# Altium PCB Flight_Computer_2_GE.PcbDoc (part 4 of 5)
Units mil, origin at the board's own origin, x right, y up, seen from the top; angles counter-clockwise.
Board outline 4000 x 3000 mil, 4 copper layers (Top Layer, GND, 3.3V, Bottom Layer), stack 62.449 mil thick; 220 components, 150 nets, 776 pads, 444 vias.
Unrouted connection lines stored in the file: 107.
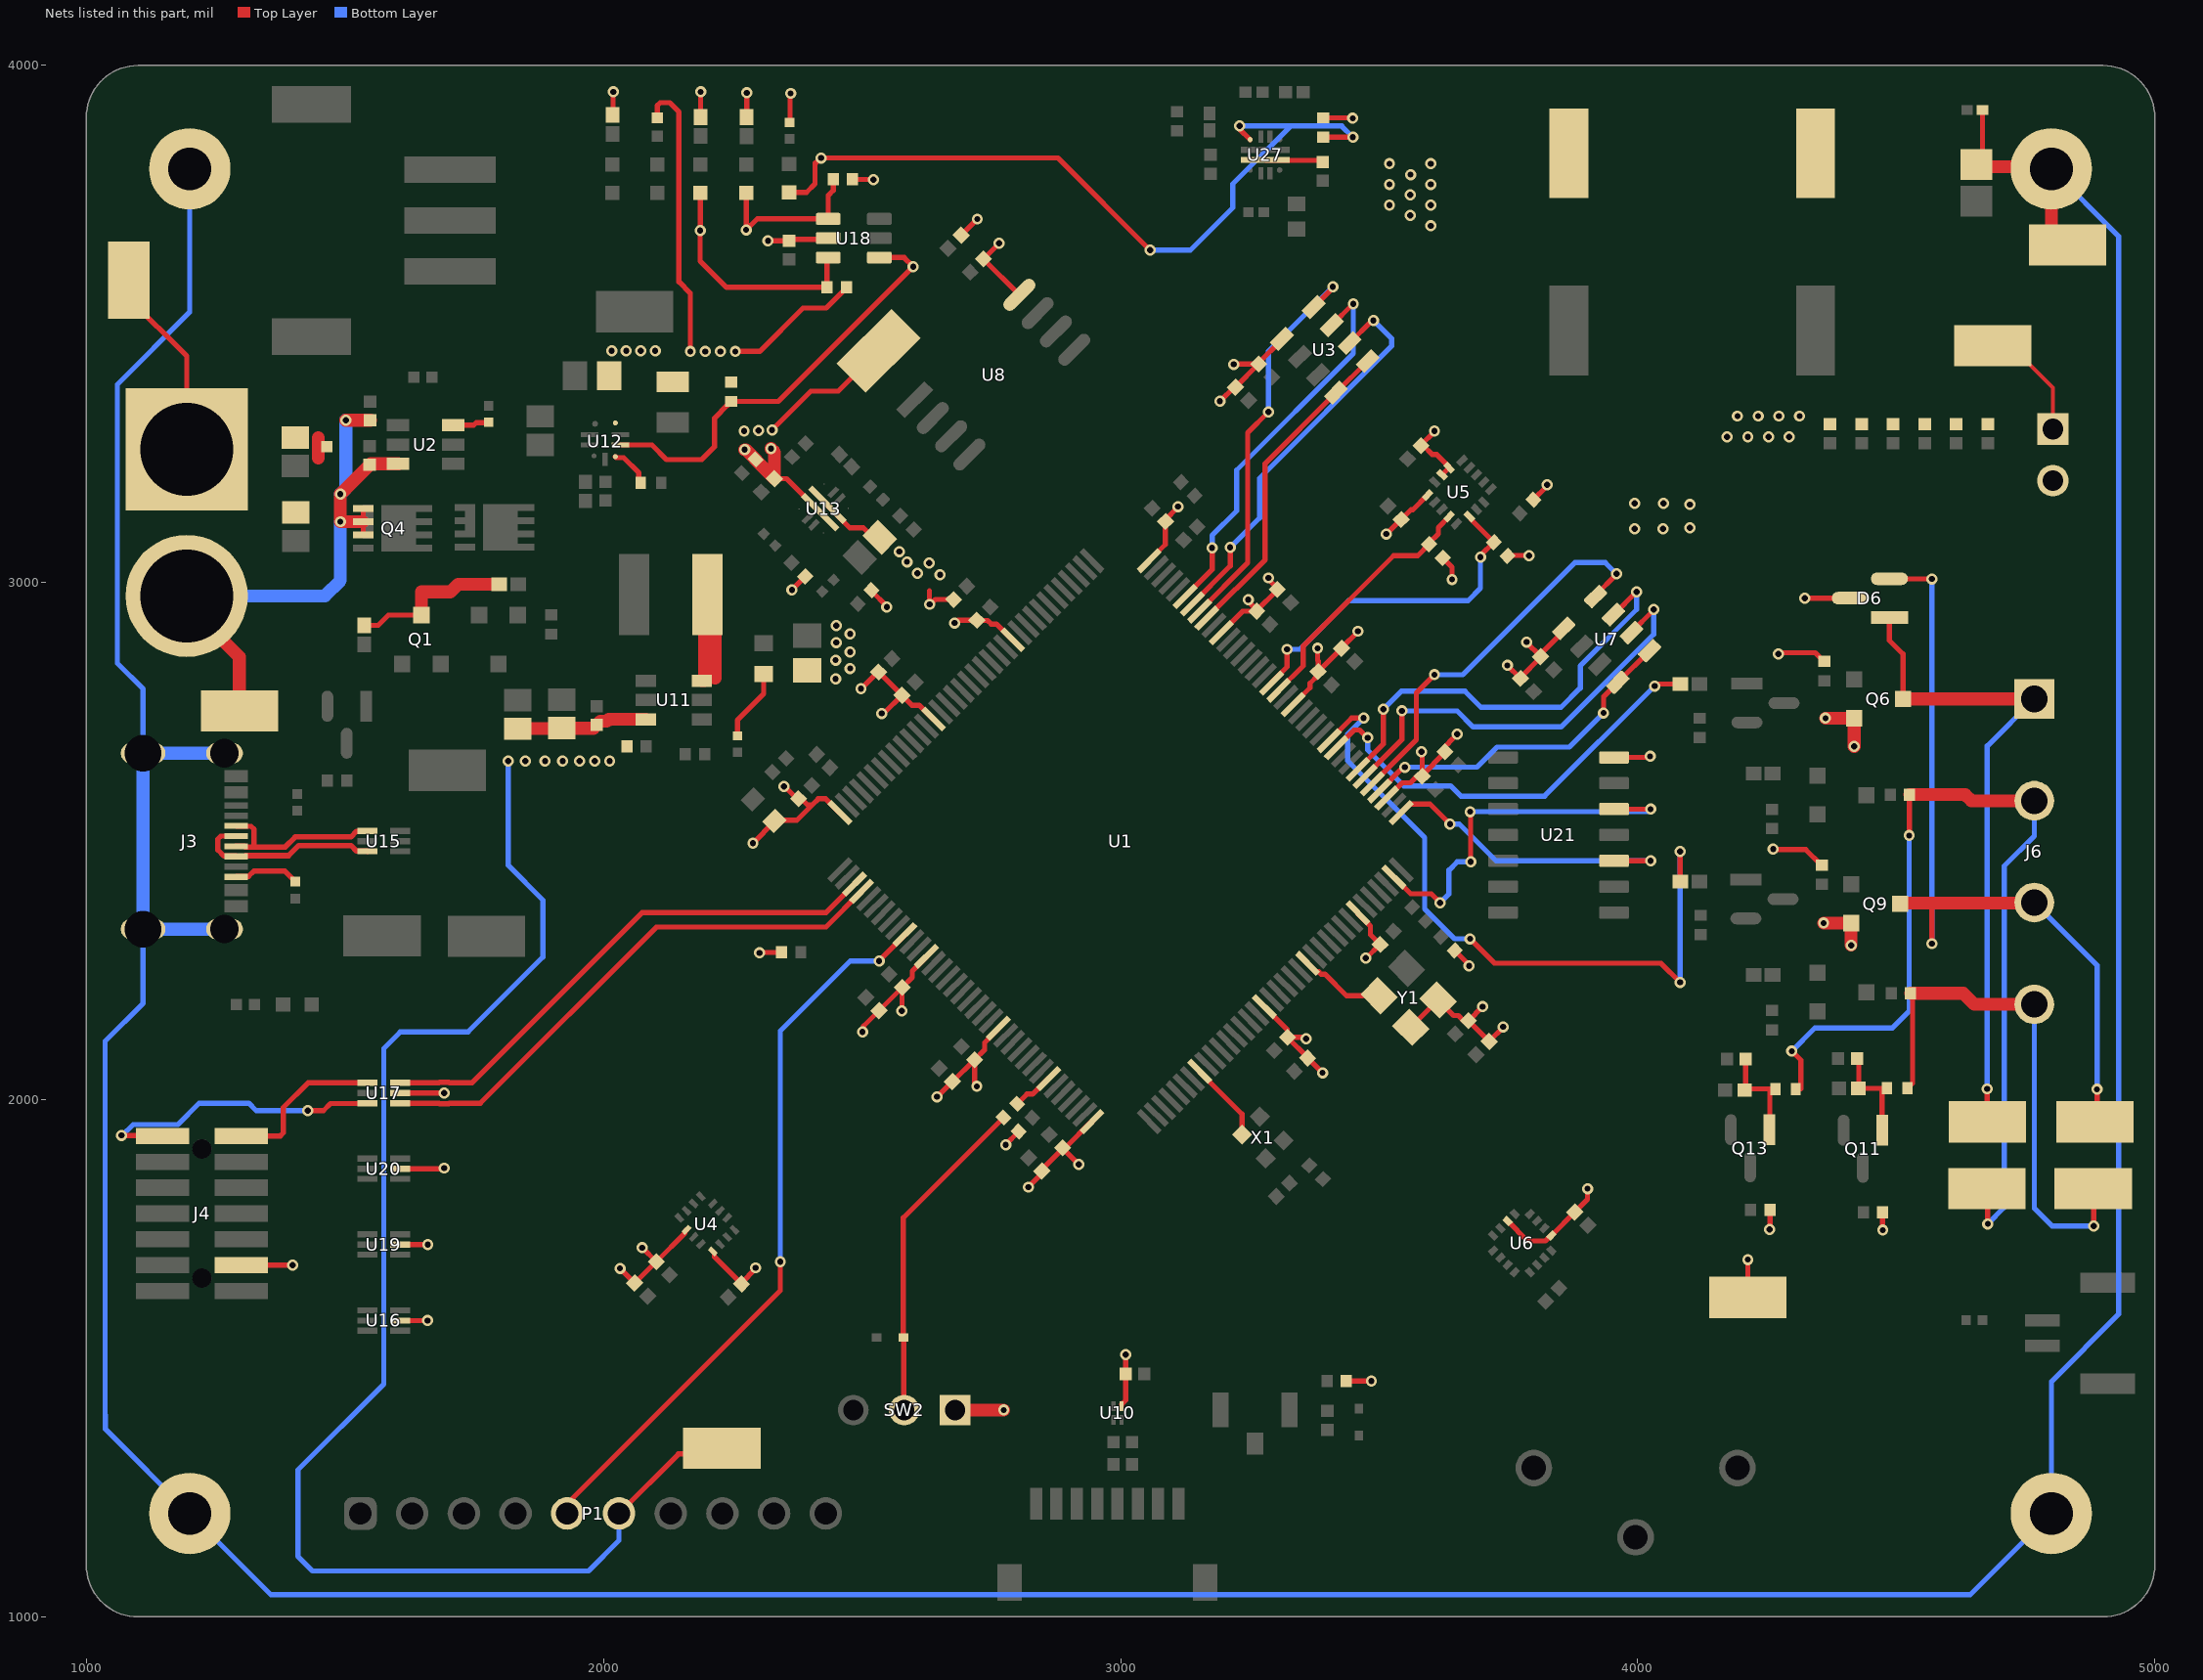
[diagram p4: the nets of this part, all layers, seen from the top]

## Part data (continued)
U2: "The Chip Type:Protection IC Voltage - Supply:1.5V~10V Voltage - Supply:1.5V~10V Charge Current - Max:- Charging Saturation Voltage:4.28V End-Off Voltage:2.9V Type of Battery:Lithium Battery Number of Cells:2 Number of Cells:2 Operating Temperature:-40℃~+8", Balance Current=-, Battery Temperature Detection="Not supported", Charging Saturation Voltage=4.28V, End-Off Voltage=2.9V, JLCPCB Part Class="Extended Part", LCSC Part Name=2节锂离子/锂聚合物电池组保护IC, Manufacturer=HYCON(宏康), Operating Temperature=-40℃~+85℃, Supply Current (Iq)=100nA, Voltage - Supply=1.5V~10V, 0V Battery Charge=Support, AddInBom=yes, Charge Current - Max=-, ConvertToPcb=yes, Datasheet=https://item.szlcsc.com/datasheet/HY2120-CB/117763.html, Device=HY2120-CB, Features="Overcharge protection；Overcurrent Protection；Over-discharge protection；Short-Circuit  Protection", FootprintName=SOT-23-6_L2.9-W1.6-P0.95-LS2.8-BR, Interface=-, ManufacturerPart=HY2120-CB, ModelId=1370be37a17e44418ae52e2b4cc1f5e5ÂŽ0819f05c4eef4c71ace90d822a990e87, ModelName=SOT-23-6_L2.9-W1.6-H1.5-LS2.8-P0.95, ModelTransform=110.73671,114.173,0,180,0,0,0.001,-0.003,0, Number of Cells=2, Supplier=LCSC, Supplier Footprint=SOT-23-6, SupplierPart=C116509, Symbol=HY2120CB, The Chip Type="Protection IC", Type of Battery="Lithium Battery"
U3: "SENSOR 17.4PSIA 24BIT 8SMD", LCSC Part #=C97627, Manufacturer="TE Connectivity", Max Operating Temperature=85°C, Max Supply Voltage=3.6V, Min Operating Temperature=-40°C, Min Supply Voltage=1.8V, Operating Current-Max=1.4mA, Package Shape/Style=Rectangular, Supplier Part Number=223-1198-1-ND, Accuracy-Max (%)=4%, Body Breadth=3mm, Body Height=0.95mm, Body Length or Diameter=5mm, Category="Pressure Sensors", ComponentLink1Description=https://www.te.com:443/usa-en/product-MS560702BA03-50.datasheet.pdf?src-supplier=IHS+Markit, ComponentLink1URL=https://www.te.com:443/usa-en/product-MS560702BA03-50.datasheet.pdf?src-supplier=IHS+Markit, ComponentLink2Description=http://www.farnell.com/datasheets/1756127.pdf?src-supplier=Farnell, ComponentLink2URL=http://www.farnell.com/datasheets/1756127.pdf?src-supplier=Farnell, ComponentLink3Description=https://datasheet.octopart.com/MS560702BA03-50-TE-Connectivity-datasheet-21074431.pdf?src-supplier=Element14, ComponentLink3URL=https://datasheet.octopart.com/MS560702BA03-50-TE-Connectivity-datasheet-21074431.pdf?src-supplier=Element14, ComponentLink4Description=https://www.te.com/commerce/DocumentDelivery/DDEController?Action=srchrtrv&DocNm=MS5607-02BA03&DocType=Data+Sheet&DocLang=English&src-supplier=Digikey, ComponentLink4URL=https://www.te.com/commerce/DocumentDelivery/DDEController?Action=srchrtrv&DocNm=MS5607-02BA03&DocType=Data+Sheet&DocLang=English&src-supplier=Digikey, ComponentLink5Description=https://datasheet.octopart.com/MS560702BA03-50-TE-Connectivity-datasheet-176112741.pdf?src-supplier=Future+Electronics, ComponentLink5URL=https://datasheet.octopart.com/MS560702BA03-50-TE-Connectivity-datasheet-176112741.pdf?src-supplier=Future+Electronics, ComponentLink6Description=https://datasheet.octopart.com/MS560702BA03-50-TE-Connectivity-datasheet-65793091.pdf?src-supplier=Sager+Electronics, ComponentLink6URL=https://datasheet.octopart.com/MS560702BA03-50-TE-Connectivity-datasheet-65793091.pdf?src-supplier=Sager+Electronics, Manufacturer Part Number=MS560702BA03-50, Mounting Technology="Surface Mount", Number of Bits=24, Output Interface Type=I2C, Output Range=0-3V, Output Type="DIGITAL VOLTAGE", Pressure Range-Max=15.95PSI, Pressure Range-Min=4.351PSI, Pressure Type=Barometric, Pricing="1=9.05, 5=8.384, 10=7.721, 25=7.436, 50=6.9272, 100=5.8731, 500=5.46908, 1000=5.89422, 3600=5.375 (USD)", Reach SVHC Compliant=No, Response Time=8220us, RoHS=Yes, RoHS Compliant=Yes, Sensor Type="PRESSURE SENSOR,PEIZORESISTIVE", Stock=43971, Supplier=Digikey, Termination=Solder
U4: "Accelerometer and Gyroscope 6-Axis 3D Digital-I2C/Digital-SPI-OUT 14-Pin LGA T/R", LCSC Part #=C459826, Manufacturer=STMicroelectronics, Max Operating Temperature=105°C, Max Supply Voltage=3.6V, Min Operating Temperature=-40°C, Min Supply Voltage=2V, Mouser Part Number=511-ASM330LHHTR, Operating Supply Voltage=3V, Supplier Part Number=497-19078-1-ND, Arrow Part Number=ASM330LHHTR, Arrow Price/Stock=https://www.arrow.com/en/products/asm330lhhtr/stmicroelectronics?utm_currency=USD&region=europe, Category=Accelerometers, China RoHS=Non-Compliant, ComponentLink1Description=https://datasheet.octopart.com:443/ASM330LHHTR-STMicroelectronics-datasheet-181242432.pdf?src-supplier=IHS, ComponentLink1URL=https://datasheet.octopart.com:443/ASM330LHHTR-STMicroelectronics-datasheet-181242432.pdf?src-supplier=IHS, ComponentLink2Description=https://datasheet.octopart.com:443/ASM330LHHTR-STMicroelectronics-datasheet-129375621.pdf?src-supplier=ODG+(Origin+Data+Global), ComponentLink2URL=https://datasheet.octopart.com:443/ASM330LHHTR-STMicroelectronics-datasheet-129375621.pdf?src-supplier=ODG+(Origin+Data+Global), Datasheet Link=https://www.st.com/resource/en/datasheet/asm330lhh.pdf, Height=0.86mm, Height - Seated (Max)=860µm, Length=3mm, Lifecycle Status=Production, Manufacturer Part Number=ASM330LHHTR, Manufacturer_Name=STMicroelectronics, Manufacturer_Part_Number=ASM330LHHTR, Mouser Price/Stock=https://www.mouser.co.uk/ProductDetail/STMicroelectronics/ASM330LHHTR?qs=lc2O%252BfHJPVYgP8P9MzExKQ%3D%3D, Number of Circuits=1, Number of Terminals=14, Output Type=Digital, Pricing="1=7.25, 5=6.54, 10=6.275, 25=5.9592, 50=5.743, 100=5.545, 500=5.34888 (USD)", REACH SVHC=Yes, RoHS=Compliant, Stock=5000, Supplier=DigiKey, Terminal Pitch=500µm, Width=2.5mm
U5: "ACCELEROMETER 100G I2C/SPI 16LGA", Case/Package=LGA, LCSC Part #=C2655068, Manufacturer=STMicroelectronics, Max Operating Temperature=85°C, Max Supply Voltage=3.6V, Min Operating Temperature=-40°C, Min Supply Voltage=2.16V, Mouser Part Number=511-H3LIS100DLTR, Operating Supply Voltage=2.5V, Supplier Part Number=497-15697-1-ND, Arrow Part Number=H3LIS100DLTR, Arrow Price/Stock=https://www.arrow.com/en/products/h3lis100dltr/stmicroelectronics?region=nac, Axis="X, Y, Z", Bandwidth=200Hz, Category=Accelerometers, China RoHS=Non-Compliant, ComponentLink1Description=https://datasheet.octopart.com:443/H3LIS100DLTR-STMicroelectronics-datasheet-181243375.pdf?src-supplier=IHS, ComponentLink1URL=https://datasheet.octopart.com:443/H3LIS100DLTR-STMicroelectronics-datasheet-181243375.pdf?src-supplier=IHS, ComponentLink2Description=https://datasheet.octopart.com:443/H3LIS100DLTR-STMicroelectronics-datasheet-41189296.pdf?src-supplier=element14+APAC, ComponentLink2URL=https://datasheet.octopart.com:443/H3LIS100DLTR-STMicroelectronics-datasheet-41189296.pdf?src-supplier=element14+APAC, Datasheet Link=https://www.st.com/resource/en/datasheet/h3lis100dl.pdf, Height=1mm, Height - Seated (Max)=1mm, Lead Free="Lead Free", Length=3mm, Lifecycle Status=Production, Manufacturer Part Number=H3LIS100DLTR, Manufacturer_Name=STMicroelectronics, Manufacturer_Part_Number=H3LIS100DLTR, Mounting Technology="Surface Mount", Mouser Price/Stock=https://www.mouser.co.uk/ProductDetail/STMicroelectronics/H3LIS100DLTR?qs=v3MacVxtdDLHj8sdza6BGw%3D%3D, Number of Circuits=1, Number of Terminals=16, Output Type=Digital, Pins=16, Pricing="1=6.69, 5=6.03, 10=5.783, 25=5.4888, 50=5.2876, 100=5.1032, 500=4.88678 (USD)", REACH SVHC=No, RoHS=Compliant, Schedule B="8542390000, 8542390000|8542390000|8542390000|8542390000|8542390000|8542390000|8542390000|8542390000|8542390000|8542390000|8542390000|8542390000|8542390000|8542390000|8542390000|8542390000|8542390000|8542390000|8542390000|8542390000|8542390000|8542390000|8542390000|85", Stock=8694, Supplier=DigiKey, Terminal Pitch=500µm, Width=3mm
U6: "8 Gauss, High Performance 3-axis Magnetic Sensor Automotive AEC-Q100", LCSC Part #=C404329, Manufacturer=Memsic, Manufacturer_Name=MEMSIC, Max Operating Temperature=105°C, Max Supply Voltage=3.6V, Min Operating Temperature=-40°C, Min Supply Voltage=2.8V, Mouser Part Number=438-MMC5983MA, Supplier Part Number=1267-MMC5983MACT-ND, Arrow Part Number=MMC5983MA, Arrow Price/Stock=https://www.arrow.com/en/products/mmc5983ma/memsic?utm_currency=USD&region=nac, Category="Linear ICs", ComponentLink1Description=https://datasheet.octopart.com:443/MMC5983MA-Memsic-datasheet-180628270.pdf?src-supplier=IHS, ComponentLink1URL=https://datasheet.octopart.com:443/MMC5983MA-Memsic-datasheet-180628270.pdf?src-supplier=IHS, ComponentLink2Description=https://datasheet.octopart.com:443/MMC5983MA-Memsic-datasheet-160655074.pdf?src-supplier=Upverter, ComponentLink2URL=https://datasheet.octopart.com:443/MMC5983MA-Memsic-datasheet-160655074.pdf?src-supplier=Upverter, Datasheet Link=https://www.mouser.com/datasheet/2/821/Memsic_09102019_MMC5983MA_Datasheet_Rev_A-1635338.pdf, Height=1mm, Length=3mm, Manufacturer Part Number=MMC5983MA, Manufacturer_Part_Number=MMC5983MA, Mounting Technology="Surface Mount", Mouser Price/Stock=https://www.mouser.co.uk/ProductDetail/MEMSIC/MMC5983MA?qs=B6kkDfuK7%2FD5qasHMdEt2g%3D%3D, Number of Terminals=16, Pricing="1=2.79, 5=2.49, 10=2.378, 25=2.244, 50=2.1522, 100=2.0681, 500=1.899, 1000=1.83604 (USD)", REACH SVHC=Yes, RoHS=Compliant, Sensing Method=Magnetoresistive, Stock=65243, Supplier=DigiKey
U7: library part CMP-010-00021-3, "Barometric Pressure Sensor, 1.8 to 3.6 V, -40 to 85 degC, 8-Pin SMD, RoHS, Tape and Reel", Case/Package=LGA-8, Max Operating Temperature=85°C, Max Supply Voltage=3.6V, Min Operating Temperature=-40°C, Min Supply Voltage=1.8V, Mounting Technology=SMT, Pins=8, RoHS Compliant=Yes, Sensor Type=Barometer
U8: library part CMP-06315-000040-1, "IC FLASH 64MBIT SPI/QUAD 8SOIJ", Case/Package=SOIC, Frequency=104MHz, Max Operating Temperature=85°C, Min Operating Temperature=-40°C, Memory Size=64Mb, Memory Type=Non-Volatile, Mount="Surface Mount", Packaging=Rail/Tube, RoHS Compliant=Yes, Series="SST26 SQI®"
U10: library part CMP-009-00205-1, "5V, 3A, 25M LOAD SWITCH WITH OPT", Pins=4
U11: library part CMP-049-000000-1, "4.5 V to 17 V input, 4 A output, synchronous step-down converter in Eco-mode 6-SOT-23-THIN -40 to 125", Manufacturer_Name="Texas Instruments", Copyright="Copyright (C) 2025 Ultra Librarian. All rights reserved.", Design Item ID=TPS564201DDCR, Manufacturer_Part_Number=TPS564201DDCR, RefDes=RefDes, Source=TPS564201DDCR.SchLib, Type=TYPE
U12: "IC REG BUCK ADJ 3A 9VQFN", LCSC Part #=C5342042, Manufacturer="Texas Instruments", Supplier Part Number=296-TPS62993QRYTRQ1CT-ND, Category="Integrated Circuits (ICs)", Manufacturer Part Number=TPS62993QRYTRQ1, Pricing="1=1.93, 10=1.418, 25=1.2916, 100=1.1519, 250=1.0854, 500=1.0453, 1000=1.01229 (USD)", RoHS=No, Stock=5849, Supplier=Digikey
U13: "FET Type:Integrated FET Number of Lines:1 Trigger Current:500mA~4.44A Trigger Current:500mA~4.44A Voltage Rating:2.7V~5.7V Voltage Rating:2.7V~5.7V Mounting Type:Surface Mount RDS(on):31mΩ Operating temperature:-40℃~+125℃ Operating temperature:-40℃~+125℃", JLCPCB Part Class="Extended Part", LCSC Part Name=具有输入反极性保护功能的电子保险丝, Manufacturer=TI(德州仪器), Operating Temperature=-40℃~+125℃, Trigger Current=500mA~4.44A, Voltage Rating=2.7V~5.7V, AddInBom=yes, ConvertToPcb=yes, Datasheet=https://www.ti.com/cn/lit/ds/symlink/tps2521.pdf, Device=TPS25210ARPWR, Features="Thermal Protection；Overcurrent Protection；Overvoltage clamping protection；Under-voltage lockout；Short-Circuit  Protection", FET Type="Integrated FET", FootprintName=VQFN-10_L2.0-W2.0-P0.45-TL, Height=1mm, Length=2mm, ManufacturerPart=TPS25210ARPWR, ModelId=80c16661c1054c2a880ef026b717f908ÂŽ0819f05c4eef4c71ace90d822a990e87, ModelName=VQFN-10_L2.0-W2.0-P0.45-TL, ModelTransform=79.1337,78.74,0,0,0,0,0,0,0, Mounting Type="Surface Mount", Number of Lines=1, RDS(on)=31mΩ, Supplier=LCSC, Supplier Footprint=QFN-10(2x2), SupplierPart=C3662707, Symbol=TPS25210ARPWR_2, Width=2mm
U15 U16 U17 U19 U20: "Integrated Circuit", LCSC Part #=C15999, Manufacturer_Name=STMicroelectronics, Mouser Part Number=511-USBLC6-2P6, Arrow Part Number=USBLC6-2P6, Arrow Price/Stock=https://www.arrow.com/en/products/usblc6-2p6/stmicroelectronics?utm_currency=USD&region=europe, Datasheet Link=https://datasheet.lcsc.com/szlcsc/STMicroelectronics-USBLC6-2P6_C15999.pdf, Height=0.6mm, Manufacturer_Part_Number=USBLC6-2P6, Mouser Price/Stock=https://www.mouser.co.uk/ProductDetail/STMicroelectronics/USBLC6-2P6?qs=6ARB0lp6jlViGcbUSvj1Mw%3D%3D
U18: library part CMP-087-000000-1, "Dual Inverter Buffer/Driver with Open-Drain Output 6-SOT-23 -40 to 125", Package="SOT-23-6 Texas Instruments", Check_prices=https://www.snapeda.com/parts/SN74LVC2G06DBVRE4/Texas+Instruments/view-part/?ref=eda, Component Type=Standard, Design Item ID=SN74LVC2G06DBVRE4, MF="Texas Instruments", MP=SN74LVC2G06DBVRE4, Pin Count=6, SnapEDA_Link=https://www.snapeda.com/parts/SN74LVC2G06DBVRE4/Texas+Instruments/view-part/?ref=snap, Source=SN74LVC2G06DBVRE4.SchLib
U21: library part CMP-0777-00108-3, "Quadruple 2-Input Positive-AND Gate, D0014A, LARGE T&R", F @ Nom Voltage(Max)(Mhz)=70, Generic Part Number=SN74LVC08A, ICC @ Nom Voltage(Max)(mA)=0.01, Manufacturer="Texas Instruments", Operating Temperature Range(C)="-40 to 125", Rating=Catalog, tpd @ Nom Voltage(Max)(ns)=9.8,6.9,4.8,4.1, Voltage(Nom)(V)=1.8,2.5,2.7,3.3, Bits(#)=4, DatasheetVersion=SCAS283Q, Input Type=TTL, Output Drive (IOL/IOH)(Max)(mA)=-24/24, Output Type=TTL, PackageReference=D0014A, Schmitt Trigger=No, Technology Family=LVC, VCC(Max)(V)=3.6, VCC(Min)(V)=1.65
U27: library part CMP-090-000000-1, "2.7-V to 23-V, 28-mâ„", Manufacturer_Name="Texas Instruments", Copyright="Copyright (C) 2025 Ultra Librarian. All rights reserved.", Design Item ID=TPS259470ARPWR, Manufacturer_Part_Number=TPS259470ARPWR, RefDes=RefDes, Source=TPS259470ARPWR.SchLib, Type=TYPE
X1: library part CMP-062-000000-2, "Description", Manufacturer_Name=Microchip, Copyright="Copyright (C) 2025 Ultra Librarian. All rights reserved.", Design Item ID=DSA6101JL2B-032K768VAO, Manufacturer_Part_Number=DSA6101JL2B-032K768VAO, RefDes=RefDes, Source=DSA6101JL2B-032K768VAO.SchLib, Type=Oscillators
Y1: library part CMP-25159-260170-1, "MEMS OSC XO 8.0000MHZ H/LV-CMOS", Case/Package=SMD/SMT, Frequency=8MHz, Frequency Stability=25ppm, Max Operating Temperature=85°C, Max Supply Current=4.5mA, Min Operating Temperature=-40°C, Mount="Surface Mount", Packaging="Cut Tape", RoHS Compliant=Yes, Series=SIT8008B

## Via types
v1: diameter 21.65, hole 11.81, Top Layer to Bottom Layer, 444 vias

## Nets (pads, with @x,y where several pads share a name; then routed paths per layer and width w, separated by ;. In a path a pad name is that pad's centre, name@x,y a point inside that pad or via, vN(x,y) a via of type N, cw(c..) or ccw(c..) an arc to the next point about the centre after c; other vN are vias at no path point)
3V3: C1.2 C2.2 C3.2 C4.2 C5.2 C6.2 C7.2 C8.2 C9.2 C10.2 C11.2 C12.2 C16.1 C18.2 C31.1 C41.1 C42.1 C43.1 C44.1 C45.1 C46.1 C47.1 C48.1 C49.1 C50.1 C51.1 C52.1 C53.1 C54.1 C55.1 C56.1 C57.1 C58.1 C59.1 C60.1 C61.1 C65.2 C66.2 C68.1 D6.3 FB1.1 J4.3 J8.1 R1.1 R2.2 R3.2 R4.2 R7.1 R8.1 R33.2 R34.2 R35.2 R37.1 R48.2 R55.2 R58.2 R61.1 R70.2 R72.1 SW2.1 U1.17 U1.30 U1.39 U1.52 U1.62 U1.72 U1.84 U1.95 U1.108 U1.121 U1.131 U1.144 U3.1 U4.5 U4.8 U5.1 U5.14 U5.15 U6.2 U6.13 U7.1 U8.8 U10.1 U13.6 U16.5 U17.5 U18.5 U19.5 U20.5 U21.14 Y1.1 Y1.4 | length 6100
  Top Layer w10: J4.3@1300,1680 v1(1399,1680) ; U16.5@1606.69,1573 v1(1660,1573) ; U19.5@1606.69,1720 1660.13,1720 v1(1660.27,1719.86) ; U20.5@1606.69,1866.68 1690.86,1866.68 v1(1692,1867.83) ; U17.5@1606.69,2013 v1(1692,2013) ; R33.2@2018,3904.33 2018.5,3904.83 2018.5,3948.5 v1(2019,3949) ; v1(2032,1674) C3.2@2060.19,1645.81 2060.69,1645.81 2101.69,1686.81 C4.2@2102.19,1686.81 ; v1(2075,1714) C4.2@2102.19,1686.81 ; U4.5@2160.69,1748.53 2157.67,1745.51 2157.67,1742.28 C4.2@2102.19,1686.81 ; R34.2@2188,3900.33 v1(2188,3949) ; U4.8@2211.5,1706.74 2214.52,1703.72 2214.52,1696.48 C5.2@2267,1644 2267,1646 2294,1673 v1(2294,1675) ; R35.2@2277,3900 v1(2277,3947) ; v1(2289,2496) 2330.88,2537.88 C41.1@2330.88,2539.12 2332.27,2540.51 2373.9,2540.51 2403.32,2569.93 ; v1(2302,2284) 2303.02,2284 2304.02,2285 R1.1@2344.3,2285 ; v1(2318.11,3661.11) C31.1@2359,3661.11 2361.44,3663.56 2431.15,3663.56 U18.5@2434.09,3666.5 ; v1(2349,2606) 2350.02,2606 2373.83,2582.19 C56.1@2377.19,2582.19 ; R70.2@2360,3889.89 2361,3890.89 2361,3945 v1(2362,3946) ; v1(2364.45,2986) R7.1@2390.22,3011.78 ; C56.1@2377.47,2581.92 2383.05,2581.92 2395.03,2569.93 2403.32,2569.93 ; U13.6@2432.61,3149.82 2462.49,3119.95 2476.44,3106 2502.49,3106 2521,3087.49 C18.2@2534.49,3087.49 ; U1.108@2457.48,2555.34 2456.2,2555.34 2429.54,2582 2415.39,2582 2403.32,2569.93 ; R37.1@2481.7,3780 2482.2,3779.5 2521.5,3779.5 v1(2522,3779) ; v1(2498,2795) 2499,2795 2531.19,2827.19 C46.1@2532.19,2827.19 C57.1@2577.19,2782.19 ; v1(2501,2131) 2503.23,2133.23 2503.23,2142.62 C55.1@2577.81,2217.19 ; R8.1@2518.22,2985.22 2518.22,2984 2548,2954.22 v1(2548,2953) ; v1(2538,2747) 2538.72,2747.72 2542.72,2747.72 C57.1@2577.19,2782.19 ; v1(2577,2172) 2577.53,2172.53 2577.53,2216.92 C55.1@2577.81,2217.19 ; U1.121@2624.51,2277.62 2624.51,2276.34 2597.04,2248.88 2597.04,2236.43 C55.1@2577.81,2217.19 ; 2630.17,2983.83 2630.17,2958.83 v1(2631,2958) 2632.02,2958 2641.5,2967.47 2676.92,2967.47 C47.1@2677.19,2967.19 ; U1.95@2638.43,2736.3 2637.15,2736.3 2610.49,2762.96 2596.43,2762.96 C57.1@2577.19,2782.19 ; v1(2645,2005.83) 2645.41,2005.83 2674.59,2035 2675.31,2035 2717.22,2076.92 2717.53,2076.92 2717.53,2031.5 2722,2027.02 v1(2722,2026) ; v1(2679,2922) 2680.02,2922 2685.5,2927.47 2721.92,2927.47 C58.1@2722.19,2927.19 ; C12.2@2691.81,3671.81 v1(2723,3703) ; C54.1@2717.81,2077.19 2737.04,2096.43 2737.04,2110.49 2763.7,2137.15 U1.131@2763.7,2138.43 ; C58.1@2722.47,2926.92 2742.85,2926.92 2749.86,2919.91 2759.76,2919.91 2790.26,2889.41 U1.84@2791.54,2889.41 ; v1(2765,3656) C11.2@2734.81,3625.81 2804.23,3556.38 U8.8@2804.31,3556.38 ; v1(2778,1913) 2778,1913.5 2802.78,1938.28 R58.2@2802.78,1938.78 ; v1(2822,1831) 2822,1832.02 2847.81,1857.83 C44.1@2847.81,1862.19 2847.81,1864.69 2887.81,1904.69 C53.1@2887.81,1907.19 ; v1(2919,1875) 2919,1875.5 2887.81,1906.69 C53.1@2887.81,1907.19 ; U1.144@2944.66,1957.48 2943.38,1957.48 2893.09,1907.19 C53.1@2887.81,1907.19 ; U10.1@3002,1407.57 3002,1410.86 3009.89,1418.75 C16.1@3009.89,1470 v1(3009.89,1507.11) ; U1.72@3055.34,3042.52 3086.53,3073.71 3086.53,3117.92 C59.1@3086.81,3118.19 3086.81,3121.78 3111,3145.98 v1(3111,3147) ; v1(3192,3351) 3193.02,3351 3218.81,3376.78 3218.81,3377.81 C1.2@3222.19,3377.81 C2.2@3267.19,3422.81 ; U1.62@3194.54,2903.33 3236.01,2944.81 3253.01,2944.81 3253.28,2944.53 3262.92,2944.53 C51.1@3263.19,2944.81 ; v1(3219,3422) 3219.53,3422.53 3266.92,3422.53 C2.2@3267.19,3422.81 ; v1(3247,2967) 3247,2964 3263.19,2947.81 C51.1@3263.19,2944.81 ; U1.17@3278.05,2180.19 3322.53,2135.71 3322.53,2121.08 C42.1@3322.81,2120.81 ; v1(3286,3009) 3286,3006.5 3303.19,2989.31 3303.19,2985.81 3263.19,2945.81 C51.1@3263.19,2944.81 ; U3.1@3312.18,3471.58 3312.18,3469.68 3267.19,3424.7 C2.2@3267.19,3422.81 ; U1.52@3333.73,2764.14 3366.32,2796.72 3366.32,2805.2 3382.19,2821.08 C60.1@3382.19,2827.81 C48.1@3427.19,2872.81 3427.19,2873.5 3459,2905.31 v1(3459,2906) ; v1(3359,2118) 3357,2118 3354.47,2120.53 3323.08,2120.53 C42.1@3322.81,2120.81 ; v1(3381,2873) 3381,2849.79 3382.47,2848.31 C60.1@3382.47,2828.08 ; v1(3390.61,2052) C68.1@3361.81,2080.81 3361.81,2081.31 3322.81,2120.31 C42.1@3322.81,2120.81 ; R72.1@3392,3898.7 3448.3,3898.7 v1(3449,3898) ; R61.1@3436.7,1456 v1(3485,1456) ; U1.30@3459.01,2361.14 3459.01,2359.86 3482.96,2335.91 3482.96,2319.43 C50.1@3502.19,2300.19 3501.19,2300.19 3475,2274 v1(3474,2274) ; v1(3514,3094) 3514.31,3094 3542.5,3122.19 C6.2@3542.81,3122.19 3561.61,3141 3565.32,3141 U5.1@3593.75,3169.43 ; U1.39@3514.68,2583.18 3544.5,2613 3560.76,2613 3573.56,2625.81 C52.1@3583.19,2625.81 ; Y1.4@3560.93,2139.93 Y1.4@3561.18,2139.93 Y1.1@3614.07,2192.82 3644.16,2162.73 3653.25,2162.73 3663.17,2152.81 C65.2@3672.81,2152.81 ; v1(3582,2673) 3582,2671.98 3583.47,2670.5 3583.47,2626.08 C52.1@3583.19,2625.81 ; v1(3607,3293) 3607,3292 3580.81,3265.81 C7.2@3580.81,3264.81 3585.67,3264.81 3602.47,3248 3611,3248 3635.51,3223.49 U5.14@3635.51,3222.33 U5.15@3621.59,3208.41 ; R4.2@3623.22,3047.78 3641,3030 v1(3641,3006) ; FB1.1@3646.22,2288.78 3673.28,2261.72 3673.28,2259.72 v1(3674,2259) ; v1(3651,2707) 3635.52,2691.52 3635.52,2690.77 3627.19,2682.44 C61.1@3627.19,2672.81 3627.19,2671.31 3583.19,2627.31 C52.1@3583.19,2625.81 ; v1(3700,2180) C65.2@3672.81,2152.81 ; v1(3740,2141) 3740,2140.5 3712.81,2113.31 C66.2@3712.81,2112.81 C65.2@3672.81,2152.81 ; v1(3748,2840) C8.2@3773.19,2814.81 3773.19,2816.5 3812,2855.31 3812,2861.7 3857.18,2906.88 U7.1@3857.18,2911.58 ; R3.2@3748.22,3051.78 3748.92,3052.47 3789.53,3052.47 v1(3790,3052) ; U6.2@3748.47,1765.45 3786.92,1727 3821.34,1727 3831.96,1737.62 U6.13@3833.37,1737.62 C10.2@3878.19,1782.44 ; v1(3785,2885) 3785,2884.5 C9.2@3812,2857.5 ; R2.2@3798.22,3160.22 3824.28,3186.28 3824.28,3188.28 v1(3825,3189) ; C10.2@3878.47,1783.08 C10.2@3878.19,1782.81 3903,1807.61 v1(3903,1828) ; U21.14@3954.28,2662 4020.98,2662 4022.98,2664 v1(4024,2664) ; J8.1@4213,1618 v1(4213,1691) ; v1(4255.3,1749) 4256,1749.7 R55.2@4256,1787 ; v1(4323,2970) D6.3@4411.2,2970 ; R48.2@4473.7,1782 4473.7,1748.3 v1(4474,1748)
  Top Layer w25: SW2.1@2680,1400 v1(2774,1400)
  other v1: 2651,3015 2607,3018 2630,3038 2587,3040 2572,3060
3V3_PG_LOW: D5.1 R37.2 U18.4 | length 319.5
  Top Layer w10: D5.1@2276,3753.44 v1(2276,3682) 2297.4,3703.4 U18.4@2434.59,3703.4 2434.59,3748.59 2444.3,3758.3 R37.2@2444.3,3780
3V3_PRE: C17.1 C22.2 C23.1 J9.1 L1.2 R9.2 R10.1 U11.6 U13.5 | length 1016.2
  Top Layer w10: R9.2@2259,2703.75 2259,2734 2310,2785 C23.1@2310,2823.47 ; v1(2326,3295) 2401,3370 2454,3370 J9.1@2532,3448 ; C17.1@2330.81,3200.81 2340.44,3200.81 2340.72,3200.53 2340.99,3200.81 2354.19,3200.81 U13.5@2423.61,3131.39
  Top Layer w25: U11.6@2190.13,2810.4 2194.81,2810.4 2195.5,2811.09 2195.5,2971.63 L1.2@2200.87,2977 2215.82,2962.05 2215.82,2815.4 ; v1(2273,3257) 2275.45,3257 R10.1@2294.22,3238.22 2294.22,3237.39 C17.1@2330.81,3200.81 2330.81,3252.19 v1(2324,3259)
  other v1: 2449,2814 2477,2834 2449,2850 2477,2866 2450,2884 2477,2901 2450,2917 2272,3293 2300,3294
5V: C19.2 C20.2 C21.1 C24.2 J7.1 L2.2 P1.6 R11.2 R19.1 R32.2 R36.1 U11.3 U12.3 | length 3868.5
  Top Layer w10: P1.6@2030,1200 2145.05,1315.05 2218.05,1315.05 J7.1@2229,1326 ; R32.2@2104,3898.72 2104,3922.14 2109.86,3928 2128,3928 2146,3910 2146,3581.64 2168,3559.64 v1(2168,3447) ; v1(2255,3447) 2302,3447 2386,3531 2430.68,3531 2469.7,3570.02 R36.1@2469.7,3571
  Top Layer w25: C19.2@1834,2717.44 1834.5,2717.94 1918.5,2717.94 C20.2@1919,2718.44 1980.55,2718.44 C21.1@1987,2724.89 1993.91,2731.8 2006.45,2731.8 2010.25,2735.6 U11.3@2081.87,2735.6
  Bottom Layer w10: v1(1816,2655) 1816,2453 1883,2386 1883,2276 1738.09,2131.09 1607.09,2131.09 1575.09,2099.09 1575.09,1450.09 1409,1284 1409,1117 1437,1089 1971,1089 2030,1148 P1.6@2030,1200
  other v1: 1849,2655 1887,2655 1921,2655 1954,2655 1983,2655 2012,2655 2197,3447 2226,3447 2016,3448 2044,3448 2072,3448 2100,3448
5V_PG: R19.2 U12.1 U18.1 | length 838
  Top Layer w10: U12.1@2033.02,3266.16 2093.84,3266.16 2122,3238 2190,3238 2215,3263 2215,3318.3 2240.19,3343.49 2240.19,3344.47 2246.02,3350.3 R19.2@2247,3350.3 2338.3,3350.3 v1(2599,3611) 2581.4,3628.6 U18.1@2533.41,3628.6
5V_PG_LOW: D4.1 R36.2 U18.6 | length 456.6
  Top Layer w10: D4.1@2187.56,3753.44 2187.28,3753.16 2187.28,3681.28 v1(2187,3681) 2187,3622 2238,3571 R36.2@2432.3,3571 2432.3,3626.31 U18.6@2434.59,3628.6
8MHz_IN: U1.23 Y1.3 | length 166.6
  Top Layer w10: U1.23@3361.57,2263.7 3377.93,2247.35 3383.27,2247.35 3387.7,2242.92 3395.08,2242.92 3436.82,2201.18 3468.03,2201.18 3470.81,2203.96 3473.59,2201.18 Y1.3@3499.93,2201.18
32KHz_IN: U1.8 X1.3 | length 156.2
  Top Layer w10: U1.8@3152.78,2054.91 3152.78,2054.22 3234.71,1972.29 X1.3@3234.71,1932.64
ACC_SCL: R4.1 U1.54 U5.4 | length 499.5
  Top Layer w10: U1.54@3305.89,2791.97 3353.28,2839.36 3353.28,2877.28 3528,3052 3574.55,3052 R4.1@3596.78,3074.22 3596.78,3076.83 3614.43,3094.48 3614.43,3106.59 U5.4@3635.51,3127.67
ACC_SDA: R3.1 U1.55 U5.6 | length 669.4
  Top Layer w10: U1.55@3291.97,2805.89 3291.97,2807.17 3322,2837.2 v1(3322,2871) ; U5.6@3674.49,3127.67 3677.97,3124.19 3677.97,3122.03 R3.1@3721.78,3078.22 3696.72,3053.17 3696.72,3049.72 v1(3696,3049)
  Bottom Layer w10: v1(3322,2871) 3347,2871 3441,2965 3672,2965 3696,2989 v1(3696,3049)
AUX: P1.5 U1.118 | length 1422.6
  Top Layer w10: P1.5@1930,1200 1940.14,1210.14 1940.14,1229.14 2342,1631 v1(2342,1687) ; v1(2533.18,2268.19) 2533.18,2269 2582.75,2318.57 U1.118@2582.75,2319.38
  Bottom Layer w10: v1(2342,1687) 2342,2133 2477.19,2268.19 v1(2533.18,2268.19)
AV_HOLD: C101.1 C102.1 C104.1 P2.2 R38.1 R47.1 U27.6 | length 316.5
  Top Layer w10: U27.6@3280,3817.32 3280.91,3816.41 3387.7,3816.41 C104.1@3391,3813.11 ; v1(4262,2485) 4263.23,2483.77 4324.95,2483.77 4355.02,2453.7 R47.1@4356,2453.7 ; v1(4272,2862) 4274.23,2864.23 4343.49,2864.23 4360.02,2847.7 R38.1@4361,2847.7
  other v1: 3994,3104 4049,3104 4101,3106 4101,3151 3994,3153 4050,3153 3600,3690 3560,3710 3520,3730 3600,3730 3560,3750 3520,3770 3600,3770 3560.89,3788.89 3520,3810 3600,3810
BARO_CS: U1.64 U3.4 U3.5 | length 626.1
  Top Layer w10: U1.64@3166.7,2931.17 3279.64,3044.11 3279.64,3230.25 U3.4@3416.58,3367.18 U3.5@3477.82,3428.42
BARO_MISO: U1.66 U3.6 | length 786.1
  Top Layer w10: U1.66@3138.86,2959.01 3212,3032.15 v1(3212,3068) ; U3.6@3443.02,3463.22 3486.08,3506.28 3488.28,3506.28 v1(3489,3507)
  Bottom Layer w10: v1(3212,3068) 3269,3125 3269,3202 3524,3457 3524,3472 v1(3489,3507)
BARO_MOSI: U1.67 U3.7 | length 759.5
  Top Layer w10: U1.67@3124.94,2972.93 3177,3024.99 v1(3177,3067) ; U3.7@3408.22,3498.02 3408.62,3498.02 3449.6,3539 v1(3450,3539)
  Bottom Layer w10: v1(3177,3067) 3177,3091 3224.5,3138.5 3224.5,3217.5 3450,3443 v1(3450,3539)
BARO_SCLK: U1.65 U3.8 | length 788.1
  Top Layer w10: U1.65@3152.78,2945.09 3246,3038.31 3246,3290 v1(3286,3330) ; U3.8@3373.42,3532.82 3409.71,3569.11 3409.71,3571.28 v1(3410.44,3572)
  Bottom Layer w10: v1(3286,3330) 3286,3447.56 v1(3410.44,3572)
BATT: C27.2 C28.2 J1.P J5.1 Q1.3 R20.2 R21.1 R22.1 | length 733.5
  Top Layer w10: J5.1@1082,3585 1082,3550.16 1194,3438.16 J1.P@1194,3257.73 ; R22.1@1537,2917.33 1564.33,2917.33 1584.24,2937.24 Q1.3@1648,2937.24
  Top Layer w25: 1448.46,3240.54 1448.46,3279.83 ; Q1.3@1648,2937.24 1648,2982 1704,2982 1719,2997 R21.1@1798.34,2997
BATT_ARM: C33.2 C34.2 C35.2 C36.2 C37.2 C38.2 J16.1 P2.1 Q6.2 Q9.2 | length 435.6
  Top Layer w8: J16.1@4687,3458 4721.84,3458 4803,3376.84 P2.1@4803,3297
  Top Layer w25: v1(4359.6,2341.6) Q9.2@4412.76,2341.6 v1(4412.76,2298.76) ; v1(4363.18,2737.82) Q6.2@4418.76,2737.82 v1(4418.76,2683.24)
  other v1: 4173,3282 4213,3282 4253,3282 4293,3282 4193,3322 4233,3322 4273,3322 4313,3322
Battery_GND: C29.1 C30.1 J1.N J13.1 Q4.1 Q4.2 Q4.3 U2.6 | length 1166.5
  Top Layer w10: Q4.3@1535.3,3092.2 Q4.2@1535.3,3117.8 Q4.1@1535.3,3143.39
  Top Layer w25: J1.N@1194,2974.27 1194,2958.2 1296,2856.2 J13.1@1296,2752 ; v1(1502.11,3313.89) C30.1@1549,3313.89 ; Q4.2@1535.3,3117.8 v1(1491.2,3117.8) v1(1491.2,3170.98) 1549.82,3229.6 U2.6@1602.9,3229.6
  Bottom Layer w25: J1.N@1194,2974.27 1461.27,2974.27 1491.2,3004.2 v1(1491.2,3117.8) ; v1(1491.2,3170.98) 1502.11,3181.89 v1(1502.11,3313.89)
BBARO_CS: U1.40 U7.4 U7.5 | length 653
  Top Layer w10: U1.40@3500.77,2597.1 3546.66,2643 v1(3550,2643) ; v1(3934,2748) 3934,2779.6 U7.4@3961.58,2807.18 U7.5@4022.82,2868.42
  Bottom Layer w10: v1(3550,2643) 3689,2643 3728,2682 3868,2682 v1(3934,2748)
BBARO_MISO: U1.42 U7.6 | length 841.2
  Top Layer w10: U1.42@3472.93,2624.94 3543.94,2695.96 v1(3543.94,2752.06) ; U7.6@3988.02,2903.22 3988.02,2904.12 4031,2947.1 v1(4031,2948)
  Bottom Layer w10: v1(3543.94,2752.06) 3650.94,2752.06 3682,2721 3852,2721 4031,2900 v1(4031,2948)
BBARO_MOSI: U1.43 U7.7 | length 854.2
  Top Layer w10: U1.43@3459.01,2638.86 3508,2687.85 v1(3508,2755) ; U7.7@3953.22,2938.02 3953.62,2938.02 3997.6,2982 v1(3998,2982)
  Bottom Layer w10: v1(3508,2755) 3543,2790 3666,2790 3697,2759 3852,2759 3889,2796 3889,2839 3998,2948 v1(3998,2982)
BBARO_SCLK: U1.41 U7.8 | length 772.4
  Top Layer w10: U1.41@3486.85,2611.02 3572,2696.18 3572,2787 v1(3607,2822) ; U7.8@3918.42,2972.82 3918.42,2975.4 3959,3015.98 v1(3959,3017)
  Bottom Layer w10: v1(3607,2822) 3662,2822 3878.62,3038.62 3937.38,3038.62 v1(3959,3017)
BOOT0: R62.1 U1.138 | length 81.1
  Top Layer w10: R62.1@2800.22,1992.22 2819,2011 2829.87,2011 2859.86,2040.99 U1.138@2861.14,2040.99
BOOT0_X: D8.1 R62.2 SW2.2 | length 646.7
  Top Layer w10: SW2.2@2581.57,1400 2580.79,1400.79 2580.79,1539.21 D8.1@2580,1540 2580,1772 R62.2@2773.78,1965.78
CC2: J3.B5 R30.1 | length 127.3
  Top Layer w10: J3.B5@1289.84,2431.1 1290.75,2432.01 1313.75,2432.01 1323.74,2442 1383.9,2442 1404,2421.9 R30.1@1404,2421.61
CHASSIS_GND: C32.1 H1.1 H2.1 H3.1 H4.1 J3.S1 J3.S2 J3.S3 J3.S4 J21.1 R76.1 | length 9949.9
  Top Layer w10: C32.1@4659.22,3804.22 4666.81,3811.81 R76.1@4666.81,3914
  Top Layer w25: C32.1@4659.22,3804.22 4795.78,3804.22 H4.1@4800,3800 4800,3680.46 4827.46,3653 J21.1@4831,3653
  Bottom Layer w10: J3.S4@1109.72,2329.92 1109.72,2186.72 1036.17,2113.17 1036.17,1390.83 1037,1390 1037,1363 H2.1@1200,1200 1357,1043 4643,1043 4795,1195 4795,1200 H1.1@4800,1200 4800,1455 4930,1585 4930,3670 H4.1@4800,3800 ; J3.S3@1109.72,2670.08 1109.72,2794.28 1060,2844 1060,3383 1200,3523 H3.1@1200,3800
  Bottom Layer w25: J3.S2@1267.2,2329.92 J3.S4@1109.72,2329.92 J3.S3@1109.72,2670.08 J3.S1@1267.2,2670.08
CON_USB_N: J3.A7 J3.B7 U15.1 | length 339.8
  Top Layer w10: J3.A7@1288.94,2491.06 J3.A7@1289.84,2490.16 ; J3.B7@1289.84,2529.53 1290.75,2528.62 1318.54,2528.62 1324.39,2522.76 1324.39,2488.61
  Top Layer w10.58: J3.A7@1289.84,2490.16 1306.57,2490.16 1308.13,2488.61 1322.48,2488.61 1371.2,2488.61 1384.33,2488.61 1404.01,2508.29 1511.65,2508.29 1522.43,2519.07 1542.69,2519.07 U15.1@1543.31,2519.68
CON_USB_P: J3.A6 J3.B6 U15.3 | length 366.7
  Top Layer w10: J3.B6@1289.84,2470.47 1288.94,2471.38 1265.94,2471.38 1254.28,2483.03 1254.28,2503.98 1260.14,2509.84 J3.A6@1289.84,2509.84
  Top Layer w10.58: J3.B6@1289.84,2470.47 1306.57,2470.47 1308.13,2472.02 1391.2,2472.02 1410.88,2491.71 1511.65,2491.71 1522.43,2480.93 1542.69,2480.93 U15.3@1543.31,2480.32
CONT_1: C40.1 Q13.1 R53.2 R54.2 | length 186.9
  Top Layer w10: R54.2@4206.7,2019 4209,2021.3 C40.1@4209,2079 ; R54.2@4211,2023 4213,2021 4256.47,2021 4255.74,2020.26 4255.74,1942.74 Q13.1@4255,1942
CONT_2: C39.1 Q11.1 R44.2 R46.2 | length 185.6
  Top Layer w10: C39.1@4424.11,2080 4427.53,2076.58 4427.53,2022 4472.47,2022 4472.74,2021.74 4472.74,1941.26 Q11.1@4473,1941
CS: R26.1 U2.3 | length 71.2
  Top Layer w10: U2.3@1709.2,3304.4 1749,3304.4 1753.7,3309.1 1776.99,3309.1 R26.1@1778,3310.11
Debug_RX: U1.112 U17.4 | length 1063.1
  Top Layer w10: U17.4@1606.69,1993.32 1682.23,1993.32 1683.37,1992.17 1700.63,1992.17 1701.77,1993.32 1761.83,1993.32 2102.51,2334 2430.34,2334 U1.112@2499.23,2402.9
Debug_RX_X: J4.14 U17.3 | length 592.6
  Top Layer w10: v1(1068,1931) 1146.24,1931 J4.14@1147.24,1930 ; v1(1428,1979) 1458.45,1979 1472.11,1992.66 1542.65,1992.66 U17.3@1543.31,1993.32
  Bottom Layer w10: v1(1068,1931) 1069.6,1931 1090.6,1952 1177,1952 1218.32,1993.32 1314.42,1993.32 1328.74,1979 v1(1428,1979)
Debug_TX: U1.111 U17.6 | length 1038.7
  Top Layer w10: U17.6@1606.69,2032.68 1682.23,2032.68 1683.37,2033.83 1700.63,2033.83 1701.77,2032.68 1745.68,2032.68 2075,2362 2430.5,2362 U1.111@2485.32,2416.82
Debug_TX_X: J4.13 U17.1 | length 314.5
  Top Layer w10: J4.13@1300,1930 1375,1930 1381,1936 1381,1985 1428.68,2032.68 U17.1@1543.31,2032.68
EFUSE_PGTH: D9.1 R72.2 U27.4 | length 1541.4
  Top Layer w10: D9.1@2359,3754.44 2392.44,3754.44 2409,3771 2409,3811 2409.98,3811 2419.98,3821 2879,3821 v1(3057,3643) ; v1(3230,3883) 3230,3877.16 U27.4@3250.47,3856.68 ; R72.2@3392,3861.3 v1(3449.3,3861.3)
  Bottom Layer w10: v1(3057,3643) 3135,3643 3217,3725 3217,3771.2 3328.8,3883 ; v1(3230,3883) 3328.8,3883 ; v1(3449.3,3861.3) 3427.6,3883 3328.8,3883
  other v1: 2421,3821
EM1_HIGH: D6.1 J6.1 J27.1 Q6.3 | length 1277.9
  Top Layer w10: D6.1@4486.8,2932.6 4486.8,2888.2 4513.24,2861.76 Q6.3@4513.24,2775.22 ; J27.1@4676,1957 v1(4676,2021)
  Top Layer w25: Q6.3@4513.24,2775.22 4766.78,2775.22 J6.1@4767,2775
  Bottom Layer w10: v1(4676,2021) 4676,2684 J6.1@4767,2775
EM1_LOW: J6.2 J22.1 R39.2 R53.1 | length 1928.9
  Top Layer w10: v1(4298,2094) 4315.53,2076.47 4315.53,2021 ; v1(4525,2511) 4525.7,2511.7 R39.2@4525.7,2590 ; J22.1@4675,1828 4677,1826 v1(4677,1760)
  Top Layer w25: R39.2@4525.7,2590 4633.42,2590 4645.27,2578.15 J6.2@4767,2578.15
  Bottom Layer w10: v1(4298,2094) 4343,2139 4493,2139 4525,2171 v1(4525,2511) ; v1(4677,1760) 4709,1792 4709,2452 4767,2510 J6.2@4767,2578.15
EM2_HIGH: D6.2 J6.3 J32.1 Q9.3 | length 1659.6
  Top Layer w10: D6.2@4486.8,3007.4 4487,3007.2 4568.8,3007.2 v1(4569,3007) ; Q9.3@4507.24,2379 4558.02,2379 4559.17,2380.15 4569.14,2370.17 v1(4569.14,2301.79) ; J32.1@4884,1957 4888.3,1961.3 v1(4888.3,2020.3)
  Top Layer w25: Q9.3@4507.24,2379 4508.39,2380.15 4559.17,2380.15 4765.85,2380.15 J6.3@4767,2381.3
  Bottom Layer w10: v1(4569,3007) 4569.07,3006.93 4569.07,2301.86 v1(4569.14,2301.79) ; J6.3@4767,2381.3 4888.3,2260 v1(4888.3,2020.3)
EM2_LOW: J6.4 J25.1 R44.1 R45.2 | length 1034
  Top Layer w10: R44.1@4521.69,2022 4531.53,2031.84 4531.53,2202.17 R45.2@4527.7,2206 ; J25.1@4881,1828 4882.15,1826.85 v1(4882.15,1756.04)
  Top Layer w25: R45.2@4527.7,2206 4629.57,2206 4651.12,2184.45 J6.4@4767,2184.45
  Bottom Layer w10: J6.4@4767,2184.45 4767,1790 4800.96,1756.04 v1(4882.15,1756.04)
FB: R12.1 U12.9 | length 78.8
  Top Layer w10: U12.9@2023.05,3243.4 2024.9,3241.55 2038.93,3241.55 2068.46,3212.01 2068.46,3194.24 R12.1@2070.35,3192.35
"FIRE 1": R41.1 U1.46 | length 836.3
  Top Layer w10: U1.46@3417.25,2680.62 3451.63,2715 3462.04,2715 3477.04,2700 v1(3478,2700) ; v1(4033,2800) 4036.15,2800 4040.15,2804 R41.1@4082.67,2804
  Bottom Layer w10: v1(3478,2700) 3478,2676.6 3547.6,2607 3638,2607 3658,2587 3820,2587 v1(4033,2800)
"FIRE 1 LOW": U1.35 U21.12 | length 747.9
  Top Layer w10: U1.35@3528.6,2430.74 3561.11,2398.23 3600.77,2398.23 v1(3618,2381) ; v1(3676,2557) 3677,2556 v1(3677,2460) ; U21.12@3954.28,2562 v1(4025,2562)
  Bottom Layer w10: v1(3618,2381) 3635,2398 3635,2444 3651,2460 v1(3677,2460) ; v1(3676,2557) 4018.98,2557 4023.98,2562 v1(4025,2562)
"FIRE 2": R50.1 U1.47 | length 1392.3
  Top Layer w10: U1.47@3403.33,2694.54 3446.79,2738 v1(3470,2738) ; v1(3675.82,2311.16) 3722.98,2264 4045,2264 v1(4082,2227) ; v1(4082,2480) 4082,2422.67 R50.1@4082.67,2422
  Bottom Layer w10: v1(3470,2738) 3439,2707 3439,2656 3588,2507 3588,2369 3645.84,2311.16 v1(3675.82,2311.16) ; v1(4082,2227) v1(4082,2480)
"FIRE 2 LOW": U1.37 U21.10 | length 605.4
  Top Layer w10: U1.37@3542.52,2555.34 3558.88,2571.7 3598.3,2571.7 v1(3637,2533) ; U21.10@3954.28,2462 v1(4025,2462)
  Bottom Layer w10: v1(3637,2533) 3655,2533 3726,2462 v1(4025,2462)

## Text inside footprints (layer, text, board x,y; h text height)
C101: Top Overlay "+" at 3886.68,3928.43 h48 r90
C102: Top Overlay "+" at 4363.69,3928.43 h48 r90
U6: Mechanical 13 "*" at 3756.26,1764.06 h50 r315